# Altium PCB MainBoardPCB_PWR.PcbDoc (part 24 of 29)
Units mm, origin at the board's own origin, x right, y up, seen from the top; angles counter-clockwise.
Board outline 333.63 x 349.38 mm, 16 copper layers (L1, L2 (GND), L3 (Sign), L4 (GND), L5 (Sign), L6 (PWR/GND), L7(PWR/GND), L8 (PWR/GND), L9 (PWR/GND), L10 (PWR/GND), L11 (PWR/GND), L12 (Sign), L13 (GND), L14 (Sign), L15 (GND), L16), stack 2.503 mm thick; 2187 components, 1615 nets, 7987 pads, 1695 vias.
Unrouted connection lines stored in the file: 4757.
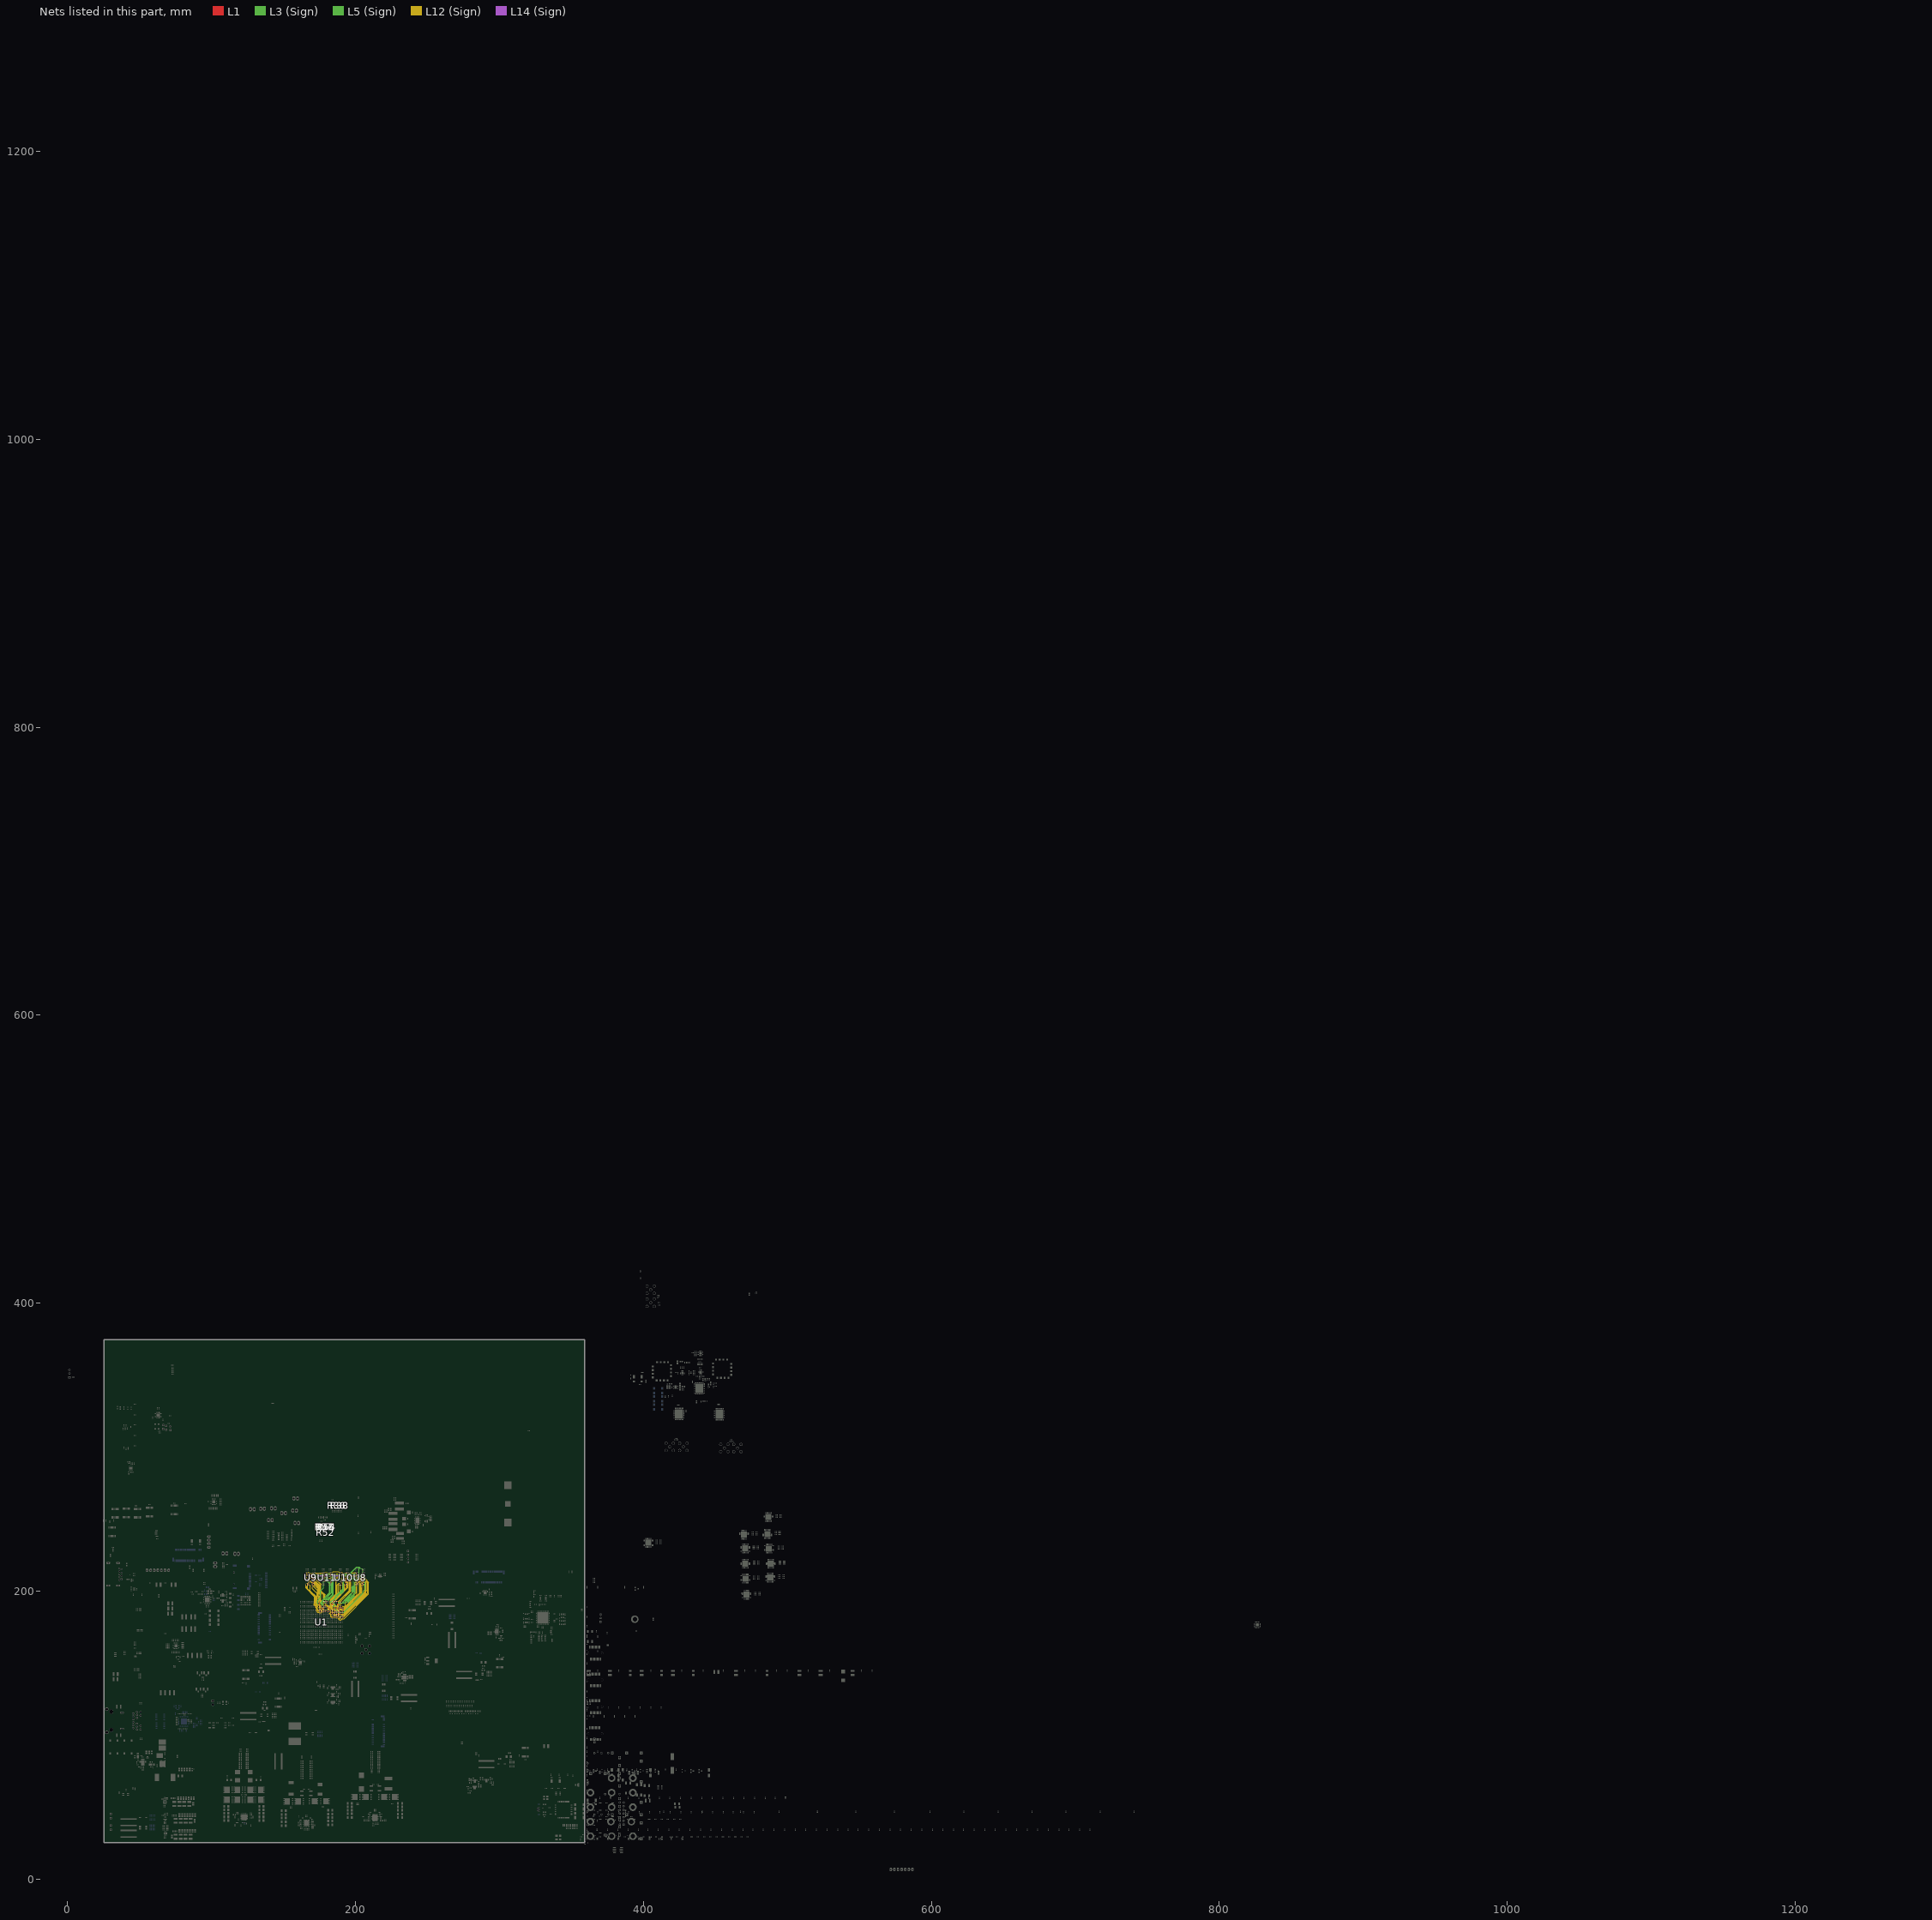
[diagram p19: the nets of this part, all layers, seen from the top]

## Via types
v1: diameter 0.5, hole 0.2, L1 to L16, 786 vias
v2: diameter 0.5/0.35/0.35/0.35/0.35/0.35/0.35/0.35/0.35/0.35/0.35/0.35/0.35/0.35/0.35/0.5 (per signal layer), hole 0.15, L1 to L16, tented both sides, 164 vias
v3: diameter 2.54, hole 1.02, L1 to L16, 152 vias
v4: diameter 0.5/0.35/0.35/0.35/0.35/0.35/0.35/0.35/0.35/0.35/0.35/0.35/0.35/0.35/0.35/0.5 (per signal layer), hole 0.2, L1 to L16, tented both sides, 100 vias
v5: diameter 0.45, hole 0.15, L1 to L16, 79 vias
v6: diameter 0.35/0/0.35 (per signal layer), hole 0.127, L1 to L3 (Sign), tented both sides, 78 vias
v7: diameter 0.45/0.45/0.45/0.45/0.45/0.45/0.45/0.45/0.45/0.45/0.45/0.45/0.45/0.45/0.45/0.45 (per signal layer), hole 0.15, L1 to L16, 65 vias
v8: diameter 0.4, hole 0.15, L1 to L16, 61 vias
v9: diameter 0.2, hole 0.1, L1 to L16, 35 vias
v10: diameter 0.5, hole 0.2, L1 to L16, tented both sides, 32 vias
v11: diameter 0.2/0/0.2 (per signal layer), hole 0.1, L1 to L3 (Sign), 28 vias
v12: diameter 0.4, hole 0.2, L1 to L16, 16 vias
v13: diameter 0.25, hole 0.2, L1 to L16, 16 vias
v14: diameter 0.3, hole 0.2, L1 to L16, 15 vias
v15: diameter 0.5/0.35/0.35/0.35/0.35/0.35/0.35/0.35/0.35/0.35/0.35/0.35/0.35/0.35/0.35/0.45 (per signal layer), hole 0.15, L1 to L16, tented both sides, 10 vias
v16: diameter 5, hole 3, L1 to L16, 9 vias
v17: diameter 0.2/0/0.2 (per signal layer), hole 0.1, L1 to L3 (Sign), tented both sides, 9 vias
v18: diameter 0.35/0/0.35 (per signal layer), hole 0.127, L1 to L3 (Sign), 7 vias
v19: diameter 0.35/0/0.35 (per signal layer), hole 0.127, L14 (Sign) to L16, tented both sides, 5 vias
v20: diameter 1.65, hole 1.65, L1 to L16, 4 vias
v21: diameter 1.15, hole 1.15, L1 to L16, 4 vias
v22: diameter 0.35, hole 0.127, L1 to L2 (GND), 2 vias
v23: diameter 0.4, hole 0.2, L1 to L16, tented both sides, 2 vias
v24: diameter 0.35, hole 0.127, L1 to L2 (GND), tented both sides, 2 vias
v25: diameter 0.508, hole 0.127, L1 to L2 (GND), 2 vias
v26: diameter 0.508, hole 0.127, L2 (GND) to L3 (Sign), 2 vias
v27: diameter 0.35, hole 0.127, L3 (Sign) to L6 (PWR/GND), tented both sides, 2 vias
v28: diameter 0.5, hole 0.2, L3 (Sign) to L6 (PWR/GND), tented both sides, 2 vias
v29: diameter 5.5, hole 3.5, L1 to L16, 1 vias
v30: diameter 0.45/0.45/0.45 (per signal layer), hole 0.15, L1 to L3 (Sign), 1 vias
v31: diameter 0.35/0.35/0.35 (per signal layer), hole 0.127, L1 to L3 (Sign), tented both sides, 1 vias
v32: diameter 0.45/0/0.45 (per signal layer), hole 0.15, L1 to L3 (Sign), tented both sides, 1 vias
v33: diameter 0.45/0/0.45 (per signal layer), hole 0.2, L14 (Sign) to L16, tented both sides, 1 vias
v34: diameter 0.35, hole 0.127, L2 (GND) to L3 (Sign), 1 vias

## Nets (pads, with @x,y where several pads share a name; then routed paths per layer and width w, separated by ;. In a path a pad name is that pad's centre, name@x,y a point inside that pad or via, vN(x,y) a via of type N, cw(c..) or ccw(c..) an arc to the next point about the centre after c; other vN are vias at no path point) (continued)
DDR4_BG0: R36.1 U1.AC28 U8.M2 U9.M2 U10.M2 U11.M2 | length 91.3
  L1 w0.116: U9.M2@171.206,212.248 v2(171.609,212.652) ; U11.M2@182.666,212.248 v2(183.07,212.652) ; v6(183.44,191.414) U1.AC28@183.927,190.927 ; U10.M2@194.127,212.248 v2(194.53,212.652) ; v15(205.215,212.621) U8.M2@205.618,212.217
  L5 (Sign) w0.092: v2(171.609,212.652) 172.737,211.524 178.132,211.524 178.398,211.523 180.823,211.524 181.453,212.153 182.572,212.153 v2(183.07,212.652) 184.198,211.524 192.283,211.524 192.913,212.153 194.032,212.153 v2(194.53,212.652) 195.321,211.861 195.455,211.861 ccw(c195.455,211.951) 195.544,211.951 195.544,212.114 cw(c195.634,212.114) 195.634,212.204 195.903,212.204 cw(c195.903,212.114) 195.992,212.114 195.992,211.861 195.992,211.608 ccw(c196.082,211.608) 196.082,211.519 196.351,211.519 ccw(c196.351,211.608) 196.44,211.608 196.44,211.861 196.44,212.037 cw(c196.53,212.037) 196.53,212.127 196.798,212.127 cw(c196.798,212.037) 196.888,212.037 196.888,211.861 196.888,211.608 ccw(c196.977,211.608) 196.977,211.519 197.246,211.519 ccw(c197.246,211.608) 197.336,211.608 197.336,211.861 197.336,212.037 cw(c197.425,212.037) 197.425,212.127 197.694,212.127 cw(c197.694,212.037) 197.783,212.037 197.783,211.861 197.783,211.608 ccw(c197.873,211.608) 197.873,211.519 198.142,211.519 ccw(c198.142,211.608) 198.231,211.608 198.231,211.861 198.231,212.037 cw(c198.321,212.037) 198.321,212.127 198.59,212.127 cw(c198.59,212.037) 198.679,212.037 198.679,211.861 198.679,211.608 ccw(c198.769,211.608) 198.769,211.519 199.037,211.519 ccw(c199.037,211.608) 199.127,211.608 199.127,211.861 199.127,212.114 cw(c199.216,212.114) 199.216,212.204 199.485,212.204 cw(c199.485,212.114) 199.575,212.114 199.575,211.951 ccw(c199.664,211.951) 199.664,211.861 200.482,211.861 200.495,211.861 200.908,211.448 201.575,211.448 202.15,211.449 202.691,211.989 204.179,211.989 204.81,212.621 v15(205.215,212.621)
  L3 (Sign) w0.092: v6(183.44,191.414) 183.44,191.689 182.917,192.211 182.901,192.227 182.901,192.652 183.202,192.953 183.384,192.953 183.614,193.183 183.857,193.183 185.222,194.548 185.222,194.625 186.168,195.571 186.168,196.559 186.553,196.945 186.693,197.085 186.904,197.296 cw(c186.974,197.225) 187.044,197.296 187.376,196.964 ccw(c187.446,197.034) 187.517,196.964 187.657,197.104 ccw(c187.587,197.174) 187.657,197.245 187.325,197.576 cw(c187.395,197.647) 187.325,197.717 187.465,197.857 cw(c187.536,197.787) 187.606,197.857 187.938,197.525 ccw(c188.008,197.595) 188.078,197.525 188.218,197.666 ccw(c188.148,197.736) 188.218,197.806 187.886,198.138 cw(c187.957,198.208) 187.886,198.278 188.027,198.418 cw(c188.097,198.348) 188.167,198.418 188.499,198.087 ccw(c188.569,198.157) 188.639,198.087 188.78,198.227 ccw(c188.71,198.297) 188.78,198.367 188.448,198.699 cw(c188.518,198.769) 188.448,198.84 188.588,198.98 cw(c188.658,198.91) 188.729,198.98 189.06,198.648 ccw(c189.131,198.718) 189.201,198.648 189.341,198.788 ccw(c189.271,198.859) 189.341,198.929 189.009,199.261 cw(c189.08,199.331) 189.009,199.401 189.22,199.612 189.57,199.962 191.659,202.05 191.659,209.131 192.168,209.64 192.168,209.871 192.392,210.095 192.392,211.28 192.796,211.684 195.732,211.684 200.736,216.687 202.603,216.687 203.263,216.027 203.754,216.027 204.251,215.531 204.433,215.531 205.11,214.853 205.11,212.966 205.151,212.925 205.151,212.684 v15(205.215,212.621)
DDR4_BG1: U1.AC27
DDR4_CAS: R57.1 U1.AJ29 U8.M5 U9.M5 U10.M5 U11.M5 | length 88.9
  L1 w0.116: U9.M5@166.406,212.248 166.802,212.645 v2(166.805,212.645) ; U11.M5@177.866,212.248 178.263,212.645 v2(178.265,212.645) ; U10.M5@189.327,212.248 189.723,212.645 v2(189.726,212.645) ; U1.AJ29@189.927,191.927 v6(190.414,192.414) ; U8.M5@200.787,212.248 200.79,212.248 v2(201.186,212.645)
  L12 (Sign) w0.092: 165.846,213.048 166.25,212.645 v2(166.805,212.645) 167.016,212.645 167.337,212.965 167.738,212.965 168.408,212.295 172.191,212.295 172.541,212.645 v2(178.265,212.645) 178.441,212.645 178.778,212.981 180.241,212.981 180.954,212.268 183.325,212.268 184.594,213.538 188.278,213.538 189.171,212.645 v2(189.726,212.645) 189.937,212.645 190.258,212.965 190.659,212.965 191.329,212.295 193.357,212.295 193.815,212.295 ccw(c193.815,212.384) 193.905,212.384 193.905,212.391 cw(c193.995,212.391) 193.995,212.48 194.263,212.48 cw(c194.263,212.391) 194.353,212.391 194.353,212.384 ccw(c194.442,212.384) 194.442,212.295 194.577,212.295 196.583,212.295 197.509,212.295 ccw(c197.509,212.384) 197.598,212.384 197.598,212.469 cw(c197.688,212.469) 197.688,212.558 197.957,212.558 cw(c197.957,212.469) 198.046,212.469 198.046,212.295 198.046,212.265 ccw(c198.136,212.265) 198.136,212.175 198.404,212.175 ccw(c198.404,212.265) 198.494,212.265 198.494,212.295 198.494,212.469 cw(c198.584,212.469) 198.584,212.558 198.852,212.558 cw(c198.852,212.469) 198.942,212.469 198.942,212.295 198.942,212.265 ccw(c199.031,212.265) 199.031,212.175 199.3,212.175 ccw(c199.3,212.265) 199.39,212.265 199.39,212.295 199.39,212.469 cw(c199.479,212.469) 199.479,212.558 199.748,212.558 cw(c199.748,212.469) 199.837,212.469 199.837,212.295 199.837,212.265 ccw(c199.927,212.265) 199.927,212.175 200.196,212.175 ccw(c200.196,212.265) 200.285,212.265 cw(c200.315,212.265) 200.315,212.295 200.509,212.295 200.859,212.645 v2(201.186,212.645)
  L3 (Sign) w0.092: v6(190.414,192.414) 191.268,192.414 191.331,192.477 198.417,199.563 198.514,199.661 198.514,199.76 ccw(c198.414,199.76) 198.414,199.859 197.577,199.859 cw(c197.577,199.958) 197.478,199.958 197.478,200.157 cw(c197.577,200.157) 197.577,200.256 198.514,200.256 199.305,200.256 ccw(c199.305,200.355) 199.404,200.355 199.404,200.554 ccw(c199.305,200.554) 199.305,200.653 198.514,200.653 197.577,200.653 cw(c197.577,200.752) 197.478,200.752 197.478,200.951 cw(c197.577,200.951) 197.577,201.05 198.514,201.05 199.567,201.05 ccw(c199.567,201.149) 199.666,201.149 199.666,201.348 ccw(c199.567,201.348) 199.567,201.447 198.514,201.447 197.577,201.447 cw(c197.577,201.546) 197.478,201.546 197.478,201.745 cw(c197.577,201.745) 197.577,201.844 198.514,201.844 199.567,201.844 ccw(c199.567,201.943) 199.666,201.943 199.666,202.142 ccw(c199.567,202.142) 199.567,202.241 198.514,202.241 197.577,202.241 cw(c197.577,202.34) 197.478,202.34 197.478,202.539 cw(c197.577,202.539) 197.577,202.638 198.514,202.638 199.567,202.638 ccw(c199.567,202.737) 199.666,202.737 199.666,202.936 ccw(c199.567,202.936) 199.567,203.035 198.514,203.035 197.577,203.035 cw(c197.577,203.134) 197.478,203.134 197.478,203.333 cw(c197.577,203.333) 197.577,203.432 198.514,203.432 199.54,203.432 ccw(c199.54,203.531) 199.639,203.531 199.639,203.73 ccw(c199.54,203.73) 199.54,203.829 198.545,203.829 cw(c198.545,203.86) 198.514,203.86 198.514,210.696 200.462,212.645 v2(201.186,212.645)
DDR4_CK0: U1.AE30
DDR4_CK1: U1.AF28
DDR4_CK_N: R52.1 U1.AF30 U8.K5 U9.K5 U10.K5 U11.K5 | length 88
  L1 w0.1: U1.AF30@186.927,192.927 187.4,192.454 v23(187.4,192.341) ; U8.K5@200.787,210.648 v2@201.184,210.251
  L1 w0.116: U9.K5@166.406,210.648 v2(166.809,210.244) ; U11.K5@177.866,210.648 v2(178.27,210.244) ; U10.K5@189.327,210.648 v2(189.73,210.244) ; v2(201.184,210.249) v2@201.184,210.251
  L5 (Sign) w0.1: v23@187.4,192.254 ccw(c187.619,192.254) 187.619,192.035 191.927,192.035 191.935,192.026 ; 198.704,198.196 199.002,198.494 ccw(c197.206,200.29) 199.746,200.29 199.746,206.887 cw(c202.498,206.887) 200.552,208.833 201.383,209.664 ccw(c201.2,209.848) 201.459,209.848 ccw(c201.156,209.848) 201.37,210.062 v2(201.184,210.249)
  L5 (Sign) w0.12: 191.935,192.026 192.303,192.026 ccw(c192.303,192.584) 192.697,192.189 193.106,192.598 ccw(c192.975,192.729) 193.16,192.729 ccw(c192.975,192.729) 193.106,192.86 192.587,193.379 cw(c192.882,193.674) 192.587,193.969 192.77,194.151 cw(c193.064,193.857) 193.359,194.151 194.823,192.687 ccw(c194.954,192.818) 195.085,192.687 195.268,192.87 ccw(c195.137,193.001) 195.322,193.001 ccw(c195.137,193.001) 195.268,193.132 193.804,194.596 cw(c194.098,194.891) 193.804,195.185 193.986,195.368 cw(c194.281,195.073) 194.576,195.368 196.04,193.904 ccw(c196.171,194.035) 196.302,193.904 196.484,194.086 ccw(c196.353,194.217) 196.538,194.217 ccw(c196.353,194.217) 196.484,194.348 195.02,195.812 cw(c195.315,196.107) 195.02,196.402 195.203,196.584 cw(c195.497,196.289) 195.792,196.584 197.256,195.12 ccw(c197.387,195.251) 197.518,195.12 197.701,195.303 ccw(c197.57,195.434) 197.755,195.434 ccw(c197.57,195.434) 197.701,195.565 196.237,197.029 cw(c196.531,197.324) 196.237,197.618 196.419,197.801 cw(c196.714,197.506) 197.009,197.801 198.473,196.337 ccw(c198.604,196.468) 198.735,196.337 198.917,196.519 ; 198.704,198.196 198.398,197.89 ccw(c198.693,197.595) 198.398,197.3 198.917,196.781 cw(c198.786,196.65) 198.971,196.65 cw(c198.786,196.65) 198.917,196.519
  L12 (Sign) w0.1: v2(166.809,210.244) v2@166.864,210.244
  L14 (Sign) w0.1: v2(166.809,210.244) 166.809,210.307 cw(c167.03,210.307) 167.03,210.528 167.55,210.528 ccw(c167.55,211.55) 168.273,210.827 168.449,211.003 cw(c170.245,209.207) 170.245,211.747 172.75,211.747 cw(c172.75,210.062) 173.941,211.254 ccw(c175.704,213.016) 175.704,210.524 177.991,210.524 cw(c177.991,210.244) v2(178.27,210.244) 178.27,210.355 cw(c178.448,210.355) 178.448,210.533 178.805,210.533 ccw(c178.805,212.074) 179.895,210.984 180.119,211.209 cw(c181.051,210.276) 181.051,211.595 183.26,211.595 cw(c183.26,209.055) 185.056,210.851 185.112,210.795 ccw(c185.766,211.449) 185.766,210.524 189.451,210.524 cw(c189.451,210.244) v2(189.73,210.244) 189.73,210.355 cw(c189.903,210.355) 189.903,210.528 190.969,210.528 ccw(c190.969,211.848) 191.903,210.914 192.557,211.569 cw(c193.108,211.018) 193.108,211.798 195.007,211.798 cw(c195.007,210.195) 196.141,211.328 196.143,211.326 ccw(c197.272,212.455) 197.272,210.858 199.049,210.858 199.302,210.858 199.632,210.858 cw(c199.632,210.681) 199.809,210.681 199.809,210.625 ccw(c199.986,210.625) 199.986,210.448 200.138,210.448 ccw(c200.138,210.625) 200.316,210.625 200.316,210.681 cw(c200.493,210.681) 200.493,210.858 200.822,210.858 201.329,210.858 201.345,210.858 cw(c201.345,210.744) 201.459,210.744 201.459,210.525 cw(c201.184,210.525) v2(201.184,210.249)
DDR4_CK_P: R54.1 U1.AG28 U8.K4 U9.K4 U10.K4 U11.K4 | length 88.2
  L1 w0.1: v23(187.427,191.567) 187.427,191.427 U1.AG28@187.927,190.927 ; U8.K4@201.587,210.648 v2@201.984,210.251
  L1 w0.116: v2(166.802,211.052) U9.K4@167.206,210.648 ; v2(178.263,211.052) U11.K4@178.666,210.648 ; v2(189.723,211.052) U10.K4@190.127,210.648 ; v2(201.984,210.249) v2@201.984,210.251
  L5 (Sign) w0.1: v23@187.447,191.587 v23(187.427,191.567) cw(c187.646,191.567) 187.646,191.786 191.927,191.786 191.935,191.794 ; 198.856,198.019 199.152,198.315 ccw(c197.206,200.261) 199.958,200.261 199.958,206.835 cw(c202.498,206.835) 200.702,208.631 201.56,209.49 ccw(c201.204,209.846) 201.708,209.846 201.708,209.848 cw(c202.011,209.848) 201.797,210.062 v2(201.984,210.249)
  L5 (Sign) w0.12: 191.935,191.794 192.304,191.794 ccw(c192.304,192.581) 192.861,192.025 193.27,192.434 ccw(c192.975,192.729) 193.392,192.729 ccw(c192.975,192.729) 193.27,193.024 192.751,193.543 cw(c192.882,193.674) 192.751,193.805 192.934,193.987 cw(c193.064,193.857) 193.195,193.987 194.659,192.523 ccw(c194.954,192.818) 195.249,192.523 195.432,192.706 ccw(c195.137,193.001) 195.554,193.001 ccw(c195.137,193.001) 195.432,193.296 193.968,194.76 cw(c194.098,194.891) 193.968,195.021 194.15,195.204 cw(c194.281,195.073) 194.412,195.204 195.876,193.74 ccw(c196.171,194.035) 196.466,193.74 196.648,193.922 ccw(c196.353,194.217) 196.77,194.217 ccw(c196.353,194.217) 196.648,194.512 195.184,195.976 cw(c195.315,196.107) 195.184,196.238 195.367,196.42 cw(c195.497,196.289) 195.628,196.42 197.092,194.956 ccw(c197.387,195.251) 197.682,194.956 197.865,195.139 ccw(c197.57,195.434) 197.987,195.434 ccw(c197.57,195.434) 197.865,195.729 196.401,197.193 cw(c196.531,197.324) 196.401,197.454 196.583,197.637 cw(c196.714,197.506) 196.845,197.637 198.309,196.173 ccw(c198.604,196.468) 198.899,196.173 199.081,196.355 ccw(c198.786,196.65) 199.203,196.65 ccw(c198.786,196.65) 199.081,196.945 198.562,197.464 cw(c198.693,197.595) 198.562,197.726 198.856,198.019
  L14 (Sign) w0.1: v2(166.802,211.052) 166.802,211.005 ccw(c167.03,211.005) 167.03,210.777 167.548,210.777 ccw(c167.548,211.556) 168.099,211.005 168.275,211.181 cw(c170.242,209.214) 170.242,211.996 172.75,211.996 cw(c172.75,210.062) 174.117,211.43 ccw(c175.704,213.016) 175.704,210.772 177.984,210.772 ccw(c177.984,211.052) v2(178.263,211.052) 178.263,210.967 ccw(c178.448,210.967) 178.448,210.782 178.804,210.782 ccw(c178.804,212.076) 179.72,211.161 179.944,211.386 cw(c181.05,210.28) 181.05,211.844 183.262,211.844 cw(c183.262,209.06) 185.23,211.028 185.286,210.972 ccw(c185.769,211.455) 185.769,210.772 189.444,210.772 ccw(c189.444,211.052) v2(189.723,211.052) 189.723,210.957 ccw(c189.903,210.957) 189.903,210.777 190.967,210.777 ccw(c190.967,211.854) 191.728,211.092 192.382,211.746 cw(c193.108,211.02) 193.108,212.046 195.009,212.046 cw(c195.009,210.2) 196.315,211.505 196.317,211.504 ccw(c197.275,212.463) 197.275,211.107 201.345,211.107 cw(c201.345,210.744) 201.708,210.744 201.708,210.525 ccw(c201.984,210.525) v2(201.984,210.249)
DDR4_CKE0: R38.1 U1.AC30 U8.K2 U9.K2 U10.K2 U11.K2 | length 92.8
  L1 w0.116: U9.K2@171.206,210.648 v2(171.609,210.244) ; U11.K2@182.666,210.648 v2(183.07,210.244) ; U1.AC30@183.927,192.927 v6(184.414,192.44) ; U10.K2@194.127,210.648 v2(194.53,210.244) ; U8.K2@205.587,210.648 v15(205.991,210.244)
  L5 (Sign) w0.092: v2(171.609,210.244) 172.185,210.82 172.355,210.82 174.401,208.774 179.645,208.774 179.683,208.812 179.961,208.812 181.017,209.867 182.178,209.867 182.555,210.244 v2(183.07,210.244) 183.799,210.244 185.81,208.233 190.761,208.233 191.403,208.875 191.426,208.875 192.034,209.484 192.359,209.484 192.743,209.867 193.505,209.867 193.882,210.244 v2(194.53,210.244) 194.53,210.012 196.084,208.458 196.977,208.458 197.527,208.458 ccw(c197.527,208.547) 197.616,208.547 197.616,208.726 cw(c197.706,208.726) 197.706,208.816 197.974,208.816 cw(c197.974,208.726) 198.064,208.726 198.064,208.458 198.064,208.189 ccw(c198.154,208.189) 198.154,208.1 198.422,208.1 ccw(c198.422,208.189) 198.512,208.189 198.512,208.458 198.512,208.726 cw(c198.601,208.726) 198.601,208.816 198.87,208.816 cw(c198.87,208.726) 198.96,208.726 198.96,208.458 198.96,208.189 ccw(c199.049,208.189) 199.049,208.1 199.318,208.1 ccw(c199.318,208.189) 199.407,208.189 199.407,208.368 cw(c199.497,208.368) 199.497,208.458 199.631,208.458 199.946,208.773 199.946,209.546 201.038,210.638 202.906,210.638 203.676,209.867 205.614,209.867 v15(205.991,210.244)
  L3 (Sign) w0.092: v6(184.414,192.44) 184.414,191.919 185.761,190.573 185.761,190.307 185.387,189.933 185.208,189.933 185.034,189.759 185.034,188.295 185.352,187.977 185.698,187.977 188.289,185.387 191.942,185.387 191.98,185.425 191.988,185.425 205.327,198.764 205.327,199.974 206.58,201.227 206.58,203.403 206.58,203.502 ccw(c206.48,203.502) 206.48,203.602 206.409,203.602 cw(c206.409,203.701) 206.31,203.701 206.31,203.899 cw(c206.409,203.899) 206.409,203.999 206.48,203.999 ccw(c206.48,204.098) 206.58,204.098 206.58,204.296 ccw(c206.48,204.296) 206.48,204.396 205.88,204.396 cw(c205.88,204.495) 205.781,204.495 205.781,204.693 cw(c205.88,204.693) 205.88,204.793 206.48,204.793 ccw(c206.48,204.892) 206.58,204.892 206.58,205.067 206.58,205.265 206.58,205.563 ccw(c206.48,205.563) 206.48,205.662 206.404,205.662 cw(c206.404,205.762) 206.305,205.762 206.305,205.96 cw(c206.404,205.96) 206.404,206.059 206.48,206.059 ccw(c206.48,206.159) 206.58,206.159 206.58,206.357 ccw(c206.48,206.357) 206.48,206.456 206.415,206.456 cw(c206.415,206.556) 206.316,206.556 206.316,206.754 cw(c206.415,206.754) 206.415,206.853 206.48,206.853 ccw(c206.48,206.953) 206.58,206.953 206.58,207.061 206.58,209.655 v15(205.991,210.244)
DDR4_CKE1: U1.AB28
DDR4_CS_B: R46.1 U1.AD30 U8.L4 U9.L4 U10.L4 U11.L4 | length 89.5
  L1 w0.116: U9.L4@167.206,211.448 167.602,211.844 v2(167.605,211.844) ; U11.L4@178.666,211.448 179.063,211.845 v2(179.065,211.845) ; U1.AD30@184.927,192.927 v6(185.414,193.414) ; U10.L4@190.127,211.448 190.523,211.844 v2(190.526,211.844) ; U8.L4@201.587,211.448 201.984,211.845 v1(201.986,211.845)
  L12 (Sign) w0.092: 165.92,211.844 166.258,211.506 167.266,211.506 v2(167.605,211.844) 167.766,211.684 177.714,211.684 177.949,211.448 178.669,211.448 v2(179.065,211.845) 179.29,211.62 185.09,211.62 185.635,212.165 188.52,212.165 189.179,211.506 190.187,211.506 v2(190.526,211.844) 190.991,211.379 191.791,210.579 193.129,210.579 193.434,210.883 194.005,210.883 194.221,210.668 197.333,210.668 199.152,210.668 cw(c199.152,210.578) 199.242,210.578 199.242,210.267 ccw(c199.331,210.267) 199.331,210.178 199.6,210.178 ccw(c199.6,210.267) 199.69,210.267 199.69,210.578 cw(c199.779,210.578) 199.779,210.668 200.048,210.668 cw(c200.048,210.578) 200.137,210.578 200.137,210.428 ccw(c200.227,210.428) 200.227,210.338 200.496,210.338 ccw(c200.496,210.428) 200.585,210.428 200.585,210.578 cw(c200.675,210.578) 200.675,210.668 200.809,210.668 201.52,211.379 v1(201.986,211.845)
  L3 (Sign) w0.092: v6(185.414,193.414) 185.414,194.546 189.573,198.704 cw(c189.622,198.655) 189.67,198.704 190.154,198.221 ccw(c190.224,198.291) 190.294,198.221 190.435,198.361 ccw(c190.364,198.431) 190.435,198.501 189.902,199.034 189.547,199.389 cw(c189.617,199.459) 189.547,199.53 189.687,199.67 cw(c189.757,199.6) 189.827,199.67 190.183,199.314 190.715,198.782 ccw(c190.785,198.852) 190.856,198.782 190.996,198.923 ccw(c190.926,198.993) 190.996,199.063 190.464,199.595 190.108,199.951 cw(c190.178,200.021) 190.108,200.091 190.249,200.231 cw(c190.319,200.161) 190.389,200.231 190.745,199.876 191.277,199.344 ccw(c191.347,199.414) 191.417,199.344 191.557,199.484 ccw(c191.487,199.554) 191.557,199.624 191.025,200.157 190.67,200.512 cw(c190.74,200.582) 190.67,200.653 190.81,200.793 cw(c190.88,200.723) 190.95,200.793 191.306,200.437 191.633,200.11 ccw(c191.703,200.18) 191.774,200.11 191.914,200.25 ccw(c191.844,200.321) 191.914,200.391 191.657,200.648 cw(c191.727,200.718) 191.657,200.788 191.727,200.858 191.851,200.982 191.851,209.051 192.36,209.561 192.36,209.678 192.602,209.92 192.602,211.177 192.614,211.189 192.614,211.2 192.777,211.364 192.788,211.364 192.79,211.365 192.793,211.365 192.895,211.468 195.788,211.468 200.793,216.473 201.84,216.473 202.587,215.725 202.587,213.593 202.348,213.353 202.348,213.287 202.233,213.173 202.233,212.851 202.307,212.777 202.307,212.512 202.233,212.438 202.233,212.092 v1(201.986,211.845)
DDR4_CS_N1: U1.AD29
DDR4_DM0: U1.AJ20 U8.E2 | length 33.5
  L1 w0.116: U1.AJ20@189.927,182.927 v2(190.331,182.523) ; U8.E2@205.587,206.648 v2(205.991,207.052)
  L12 (Sign) w0.092: v2(190.331,182.523) 190.598,182.791 190.598,182.87 190.847,183.119 191.225,183.119 191.602,183.119 207.058,198.574 207.058,204.979 207.08,205 207.08,205.903 205.991,206.992 v2(205.991,207.052)
DDR4_DM1: U1.AJ25 U8.E4 | length 27
  L1 w0.116: U1.AJ25@189.927,187.927 v4(190.414,188.414) ; U8.E4@201.587,206.648 v2(201.991,207.052)
  L12 (Sign) w0.092: v4(190.414,188.414) 190.916,188.414 191.231,188.1 191.275,188.1 191.281,188.093 191.547,188.093 191.554,188.1 192.138,188.1 202.827,198.789 202.827,206.397 202.173,207.052 v2(201.991,207.052)
DDR4_DM2: U1.AF21 U10.E2 | length 31.2
  L1 w0.116: v4(186.44,184.414) U1.AF21@186.927,183.927 ; U10.E2@194.127,206.648 v2(194.53,207.052)
  L12 (Sign) w0.092: v4(186.44,184.414) 186.791,184.063 187.49,184.063 187.546,184.119 187.547,184.119 187.735,184.307 187.735,184.308 188.337,184.909 188.337,185.811 187.337,186.811 187.337,188.876 185.344,190.868 185.344,192.82 194.92,202.396 194.92,206.662 v2(194.53,207.052)
DDR4_DM3: U1.AE25 U10.E4 | length 24.3
  L1 w0.116: v4(185.44,188.414) U1.AE25@185.927,187.927 ; U10.E4@190.127,206.648 v2(190.53,206.244)
  L12 (Sign) w0.092: v4(185.44,188.414) 185.028,188.002 184.292,188.002 184.044,188.25 184.044,190.268 184,190.312 184,190.494 183.989,190.505 183.989,192.593 184,192.604 184,193.418 191.275,200.693 191.275,200.96 191.302,200.987 191.302,205.473 v2(190.53,206.244)
DDR4_DM4: U1.Y24 U9.E2 | length 26.2
  L1 w0.116: v2(170.802,206.244) U9.E2@171.206,206.648 ; v10(180.44,186.44) U1.Y24@180.927,186.927
  L12 (Sign) w0.092: v2(170.802,206.244) 171.06,206.244 174.864,202.441 174.864,198.427 175.692,197.599 175.692,193.586 176.173,193.105 176.173,191.605 177.316,190.462 177.316,188.241 178.018,187.539 178.018,187.25 178.25,187.018 178.578,187.018 178.654,187.094 179.225,187.094 179.342,186.977 179.596,186.977 180.133,186.44 v10(180.44,186.44)
DDR4_DM5: U1.R24 U9.E4 | length 27.3
  L1 w0.116: U9.E4@167.206,206.648 v2(167.609,206.244) ; U1.R24@175.927,186.927 v10(176.414,187.414)
  L12 (Sign) w0.092: v2(167.609,206.244) 166.648,205.283 166.648,201.508 172.11,196.045 172.11,191.401 172.415,191.097 172.415,190.005 173.371,189.049 173.371,186.977 173.759,186.588 174.231,186.588 174.663,187.02 175.704,187.02 176.099,187.414 v10(176.414,187.414)
DDR4_DM6: U1.V28 U11.E2 | length 19.8
  L1 w0.116: v6(178.44,191.414) U1.V28@178.927,190.927 ; U11.E2@182.666,206.648 183.063,206.252 v6(183.063,206.249)
  L3 (Sign) w0.092: v6(178.44,191.414) 178.44,191.813 178.854,192.227 178.854,192.621 178.625,192.85 178.141,192.85 177.895,193.096 177.895,193.62 178.202,193.927 178.624,193.927 183.595,198.898 183.595,205.719 183.592,205.719 v6(183.063,206.249)
DDR4_DM7: U1.P28 U11.E4 | length 19.6
  L1 w0.116: v6(174.44,191.414) U1.P28@174.927,190.927 ; v6(178.27,207.047) 178.27,207.044 U11.E4@178.666,206.648
  L3 (Sign) w0.092: v6(174.44,191.414) 173.779,191.414 173.531,191.662 173.531,193.351 175.832,195.651 175.832,200.16 177.866,202.195 177.866,206.643 v6(178.27,207.047)
DDR4_DM8: U1.AA27
DDR4_DQ0: U1.AH22 U8.G2 | length 46.8
  L1 w0.116: U1.AH22@188.927,184.927 v4(189.414,184.44) ; U8.G2@205.587,208.248 v2(205.991,208.652)
  L12 (Sign) w0.092: v4(189.414,184.44) 188.659,183.684 188.659,183.406 187.844,182.591 187.844,182.586 187.795,182.537 187.795,181.059 188.603,180.251 189.068,180.251 189.276,180.044 189.604,180.044 189.724,180.164 190.336,180.164 191.059,180.886 191.999,180.886 209.08,197.968 209.08,206.25 206.678,208.652 v2(205.991,208.652)
DDR4_DQ1: U1.AH21 U8.F4 | length 39.2
  L1 w0.116: U1.AH21@188.927,183.927 v4(189.414,183.44) ; v2(201.184,207.852) U8.F4@201.587,207.448
  L12 (Sign) w0.092: v4(189.414,183.44) 190.099,184.125 190.275,184.125 190.281,184.119 190.547,184.119 190.553,184.125 191.275,184.125 191.281,184.119 191.547,184.119 191.598,184.169 191.637,184.169 206.591,199.123 206.591,205.055 206.696,205.16 206.696,205.744 205.901,206.539 205.718,206.539 205.226,207.031 205.144,207.031 204.645,207.531 204.251,207.531 204.063,207.719 203.584,207.719 202.337,208.965 201.858,208.965 201.184,208.291 v2(201.184,207.852)
DDR4_DQ2: U1.AJ22 U8.H3 | length 45.3
  L1 w0.116: U1.AJ22@189.927,184.927 v4(190.414,184.44) ; v2(204.384,209.452) U8.H3@204.787,209.048
  L12 (Sign) w0.092: v4(190.414,184.44) 189.926,184.44 189.421,183.934 189.192,183.934 188.85,183.593 188.85,183.326 188.036,182.512 188.036,181.216 188.326,180.927 188.852,180.927 190.068,182.143 190.503,182.143 191.01,182.65 191.01,182.656 191.198,182.844 191.464,182.844 191.501,182.881 191.868,182.881 207.25,198.263 207.25,204.899 207.272,204.921 207.272,205.982 206.362,206.892 206.362,207.135 206.081,207.415 205.303,207.415 204.897,207.822 204.897,208.593 204.384,209.106 v2(204.384,209.452)
DDR4_DQ3: U1.AK22 U8.H4 | length 34.5
  L1 w0.116: U1.AK22@190.927,184.927 v4(191.414,184.44) ; U8.H4@201.587,209.048 v2(201.991,208.644)
  L12 (Sign) w0.092: v4(191.414,184.44) 206.399,199.424 206.399,205.134 206.504,205.239 206.504,205.664 205.821,206.347 205.639,206.347 205.146,206.839 205.065,206.839 204.576,207.327 203.308,207.327 v2(201.991,208.644)
DDR4_DQ4: U1.AK20 U8.H2 | length 36.6
  L1 w0.116: U1.AK20@190.927,182.927 v2(191.331,182.523) ; v2(205.184,209.452) U8.H2@205.587,209.048
  L12 (Sign) w0.092: v2(191.331,182.523) 192.023,182.523 207.442,197.942 207.442,204.82 207.464,204.841 207.464,206.062 206.565,206.96 206.565,207.234 206.192,207.607 205.44,207.607 205.39,207.656 205.386,207.656 205.089,207.953 205.089,208.96 205.184,209.055 v2(205.184,209.452)
DDR4_DQ5: U1.AJ19 U8.H5 | length 44.5
  L1 w0.116: U1.AJ19@189.927,181.927 v2(190.331,181.523) ; v2(200.384,209.452) U8.H5@200.787,209.048
  L12 (Sign) w0.092: v2(190.331,181.523) 190.655,181.523 191.148,182.016 191.546,182.016 191.861,182.331 192.103,182.331 207.634,197.863 207.634,198.104 208.358,198.828 208.358,199.097 208.369,199.108 208.369,199.695 207.656,200.408 207.656,206.415 206.223,207.848 205.465,207.848 205.296,208.018 205.296,208.776 205.505,208.985 205.505,209.585 205.241,209.848 202.641,209.848 202.457,209.664 202.275,209.664 202.25,209.639 202.124,209.765 201.858,209.765 201.795,209.702 200.634,209.702 v2(200.384,209.452)
DDR4_DQ6: U1.AK19 U8.J3 | length 40.6
  L1 w0.116: U1.AK19@190.927,181.927 v2(191.331,181.523) ; v2(204.251,210.312) 204.323,210.312 204.387,210.248 U8.J3@204.787,209.848
  L12 (Sign) w0.092: v2(191.331,181.523) 191.531,181.724 191.721,181.913 191.934,181.913 192.16,182.139 192.182,182.139 207.826,197.783 207.826,197.805 208.561,198.541 208.561,205.795 206.318,208.039 206.304,208.039 206.302,208.04 205.795,208.04 205.587,208.248 205.587,208.796 205.697,208.906 205.697,209.664 205.614,209.747 205.614,210.337 205.393,210.557 204.689,210.557 204.38,210.248 204.317,210.312 v2(204.251,210.312)
DDR4_DQ7: U1.AH19 U8.J4 | length 41
  L1 w0.116: v4(188.44,181.44) U1.AH19@188.927,181.927 ; U8.J4@201.587,209.848 v2(201.991,209.444)
  L12 (Sign) w0.092: v4(188.44,181.44) 189.029,181.44 189.865,182.275 189.865,183.455 190.221,183.811 191.646,183.811 206.866,199.03 206.866,205.058 206.888,205.08 206.888,205.823 205.98,206.731 205.798,206.731 205.305,207.223 205.224,207.223 204.705,207.742 204.705,207.985 204.516,208.173 204.251,208.173 204.218,208.14 203.67,208.14 203.251,208.559 202.366,209.444 v2(201.991,209.444)
DDR4_DQ8: U1.AH23 U8.A3 | length 25.4
  L1 w0.116: U1.AH23@188.927,185.927 v4(189.414,186.414) ; v2(204.384,203.044) U8.A3@204.787,203.448
  L12 (Sign) w0.092: v4(189.414,186.414) 189.871,186.871 191.687,186.871 191.847,187.03 192.265,187.03 204.384,199.149 v2(204.384,203.044)
DDR4_DQ9: U1.AK23 U8.B5 | length 39.3
  L1 w0.116: U1.AK23@190.927,185.927 v4(191.414,186.414) ; v2(200.384,203.844) U8.B5@200.787,204.248
  L12 (Sign) w0.092: v4(191.414,186.414) 192.703,186.414 204.705,198.416 204.705,203.711 206.312,205.319 206.312,205.585 205.742,206.155 205.559,206.155 205.067,206.647 204.985,206.647 204.659,206.973 203.066,206.973 202.283,207.757 201.572,207.757 201.251,207.436 201.251,206.724 201.528,206.447 201.528,206.146 201.505,206.123 201.505,206.119 201.408,206.022 201.408,205.94 201.316,205.848 200.971,205.848 200.596,206.223 200.201,206.223 199.798,205.819 199.798,204.834 200.384,204.249 v2(200.384,203.844)
DDR4_DQ10: U1.AG24 U8.C3 | length 27.9
  L1 w0.116: U1.AG24@187.927,186.927 187.93,186.927 v4(188.43,187.427) ; v2(204.384,204.644) U8.C3@204.787,205.048
  L12 (Sign) w0.092: v4(188.43,187.427) 188.951,186.906 189.574,186.906 189.731,187.063 191.555,187.063 191.715,187.222 192.185,187.222 204.02,199.057 204.02,204.281 v2(204.384,204.644)
DDR4_DQ11: U1.AK24 U8.C4 | length 32.4
  L1 w0.116: U1.AK24@190.927,186.927 v4(191.414,187.414) ; U8.C4@201.587,205.048 v2(201.991,205.452)
  L12 (Sign) w0.092: v4(191.414,187.414) 192.106,187.414 203.721,199.03 203.721,204.521 204.935,205.735 204.935,206.154 204.5,206.589 202.907,206.589 202.124,207.373 201.783,207.373 201.635,207.224 201.635,206.937 201.841,206.731 202.171,206.731 202.548,206.354 202.548,206.009 v2(201.991,205.452)
DDR4_DQ12: U1.AJ26 U8.C2 | length 32.1
  L1 w0.116: U1.AJ26@189.927,188.927 v4(190.414,189.414) ; U8.C2@205.587,205.048 v2(205.991,205.452)
  L12 (Sign) w0.092: v4(190.414,189.414) 192.297,189.414 193.04,190.157 193.04,191.427 200.474,198.861 200.474,203.281 200.708,203.515 200.708,204.327 199.99,205.045 199.99,205.572 200.191,205.773 200.562,205.773 200.711,205.624 201.363,205.624 201.748,206.009 201.748,206.499 201.443,206.804 201.443,207.304 201.704,207.565 202.203,207.565 202.986,206.781 204.579,206.781 204.906,206.455 204.987,206.455 205.48,205.963 v2(205.991,205.452)
DDR4_DQ13: U1.AK25 U8.C5 | length 22.9
  L1 w0.116: U1.AK25@190.927,187.927 v4(191.414,188.414) ; v2(200.384,205.452) U8.C5@200.787,205.048
  L12 (Sign) w0.092: v4(191.414,188.414) 192.018,188.414 200.99,197.387 200.99,204.845 v2(200.384,205.452)
DDR4_DQ14: U1.AG25 U8.D3 | length 28.9
  L1 w0.116: U1.AG25@187.927,187.927 187.933,187.927 188.43,188.424 v4(188.43,188.455) ; v2(204.384,206.252) U8.D3@204.787,205.848
  L12 (Sign) w0.092: v4(188.43,188.455) 189.154,187.731 189.277,187.731 189.281,187.735 192.155,187.735 203.529,199.109 203.529,205.397 v2(204.384,206.252)
DDR4_DQ15: U1.AH26 U8.D4 | length 24
  L1 w0.116: U1.AH26@188.927,188.927 v4(189.414,189.414) ; v2(201.184,206.252) U8.D4@201.587,205.848
  L12 (Sign) w0.092: v4(189.414,189.414) 189.414,190.561 199.606,200.753 199.606,206.075 200.033,206.502 200.933,206.502 v2(201.184,206.252)
DDR4_DQ16: U1.AD22 U10.G2 | length 34.4
  L1 w0.116: v4(184.44,184.44) U1.AD22@184.927,184.927 ; U10.G2@194.127,208.248 v2(194.53,208.652)
  L12 (Sign) w0.092: v4(184.44,184.44) 185.085,183.794 187.493,183.794 187.625,183.927 187.627,183.927 187.927,184.227 187.927,184.229 188.529,184.83 188.529,185.891 187.529,186.891 187.529,190.641 187.901,191.014 187.901,192.843 195.567,200.508 195.567,208.204 195.12,208.652 v2(194.53,208.652)
DDR4_DQ17: U1.AE22 U10.F4 | length 33.9
  L1 w0.116: v4(185.44,184.44) U1.AE22@185.927,184.927 ; U10.F4@190.127,207.448 v2(190.53,207.044)
  L12 (Sign) w0.092: v4(185.44,184.44) 185.905,184.44 186.276,184.81 187.536,184.81 187.953,185.227 187.953,185.652 186.953,186.652 186.953,188.716 184.96,190.709 184.96,190.892 184.949,190.903 184.949,192.195 184.96,192.206 184.96,193.021 194.28,202.341 194.28,205.287 194.044,205.523 194.044,205.585 193.856,205.773 193.554,205.773 192.1,207.226 190.712,207.226 v2(190.53,207.044)
DDR4_DQ18: U1.AF22 U10.H3 | length 32
  L1 w0.116: U1.AF22@186.927,184.927 v4(187.414,184.44) ; U10.H3@193.327,209.048 v2(193.73,209.452)
  L12 (Sign) w0.092: v4(187.414,184.44) 187.437,184.44 188.145,185.148 188.145,185.732 187.145,186.732 187.145,188.796 185.152,190.789 185.152,190.971 185.141,190.983 185.141,192.115 185.152,192.127 185.152,192.941 194.526,202.315 194.526,205.549 193.73,206.345 v2(193.73,209.452)
DDR4_DQ19: U1.AG21 U10.H4 | length 38.2
  L1 w0.116: v4(187.44,183.44) U1.AG21@187.927,183.927 ; v2(189.723,208.644) U10.H4@190.127,209.048
  L12 (Sign) w0.092: v4(187.44,183.44) 187.569,183.569 187.569,183.598 187.705,183.735 187.706,183.735 188.119,184.148 188.119,184.149 188.721,184.75 188.721,185.97 187.721,186.97 187.721,190.561 188.316,191.156 188.316,192.985 196.101,200.77 196.101,208.09 195.143,209.048 194.342,209.048 194.101,209.289 194.101,209.594 193.892,209.803 193.607,209.803 193.327,209.523 193.327,209.227 192.744,208.644 v2(189.723,208.644)
DDR4_DQ20: U1.AD20 U10.H2 | length 36.7
  L1 w0.116: v10(184.44,182.44) U1.AD20@184.927,182.927 ; U10.H2@194.127,209.048 v2(194.53,209.452)
  L12 (Sign) w0.092: v10(184.44,182.44) 185.044,183.044 187.628,183.044 187.784,183.2 187.784,183.543 187.786,183.543 188.311,184.068 188.311,184.07 188.913,184.671 188.913,186.087 187.913,187.087 187.913,190.482 188.57,191.139 188.57,192.968 196.469,200.867 196.469,207.994 195.011,209.452 v2(194.53,209.452)
DDR4_DQ21: U1.AF20 U10.H5 | length 35.8
  L1 w0.116: v4(186.44,182.44) U1.AF20@186.927,182.927 ; v2(188.923,208.644) U10.H5@189.327,209.048
  L12 (Sign) w0.092: v4(186.44,182.44) 186.186,182.186 185.915,182.186 185.77,182.042 183.277,182.042 183.044,182.276 183.044,186.604 183.045,186.606 183.045,188.615 182.78,188.88 182.78,194.065 186.679,197.964 186.679,208.581 187.33,209.232 188.54,209.232 188.923,208.85 v2(188.923,208.644)
DDR4_DQ22: U1.AE20 U10.J3 | length 38.5
  L1 w0.116: v4(185.44,182.44) U1.AE20@185.927,182.927 ; v2(192.923,209.444) U10.J3@193.327,209.848
  L12 (Sign) w0.092: v4(185.44,182.44) 185.791,182.791 187.647,182.791 188.008,183.152 188.008,183.487 189.105,184.584 189.105,186.27 188.105,187.27 188.105,190.376 188.927,191.199 188.927,192.178 196.952,200.203 196.952,207.782 194.886,209.848 194.241,209.848 194.094,209.994 193.473,209.994 v2(192.923,209.444)
DDR4_DQ23: U1.AG20 U10.J4 | length 39
  L1 w0.116: v4(187.44,182.44) U1.AG20@187.927,182.927 ; v2(189.723,209.444) U10.J4@190.127,209.848
  L12 (Sign) w0.092: v4(187.44,182.44) 186.991,181.991 185.991,181.991 185.839,181.839 183.172,181.839 182.829,182.181 182.829,183.596 182.119,184.307 182.119,184.573 182.852,185.306 182.852,186.683 182.853,186.685 182.853,188.535 182.588,188.801 182.588,194.145 186.487,198.044 186.487,208.661 187.674,209.848 189.32,209.848 v2(189.723,209.444)
DDR4_DQ24: U1.AG23 U10.A3 | length 24
  L1 w0.116: v4(187.44,185.44) U1.AG23@187.927,185.927 ; v2(192.923,203.044) U10.A3@193.327,203.448
  L12 (Sign) w0.092: v4(187.44,185.44) 186.961,185.44 185.761,186.64 185.761,188.547 185.226,189.082 185.226,189.628 184.384,190.471 184.384,190.653 184.373,190.664 184.373,192.433 184.384,192.445 184.384,193.259 192.799,201.674 192.799,202.92 v2(192.923,203.044)
DDR4_DQ25: U1.AF23 U10.B5 | length 25.8
  L1 w0.116: v4(186.44,185.44) U1.AF23@186.927,185.927 ; v2(188.923,204.652) U10.B5@189.327,204.248
  L12 (Sign) w0.092: v4(186.44,185.44) 186.194,185.194 185.753,185.194 185.623,185.064 185.293,185.064 185.014,185.344 184.29,185.344 184.061,185.572 184.061,187.165 183.66,187.566 183.66,190.109 183.616,190.153 183.616,190.335 183.605,190.346 183.605,192.752 183.616,192.763 183.616,193.577 183.66,193.621 183.66,194.13 189.343,199.814 189.343,204.248 188.94,204.652 v2(188.923,204.652)
DDR4_DQ26: U1.AF25 U10.C3 | length 22.7
  L1 w0.116: v4(186.44,188.414) U1.AF25@186.927,187.927 ; v2(192.923,204.644) U10.C3@193.327,205.048
  L12 (Sign) w0.092: v4(186.44,188.414) 186.44,188.686 184.576,190.55 184.576,190.733 184.565,190.744 184.565,192.354 184.576,192.365 184.576,193.18 193.777,202.381 193.777,204.267 193.37,204.673 192.952,204.673 v2(192.923,204.644)
DDR4_DQ27: U1.AE23 U10.C4 | length 24.7
  L1 w0.116: v4(185.44,185.44) U1.AE23@185.927,185.927 ; U10.C4@190.127,205.048 v2(190.53,204.644)
  L12 (Sign) w0.092: v4(185.44,185.44) 185.44,186.556 184.861,187.134 184.861,187.553 184.604,187.81 184.196,187.81 183.852,188.155 183.852,190.188 183.808,190.232 183.808,190.415 183.797,190.426 183.797,192.672 183.808,192.683 183.808,193.498 183.852,193.542 183.852,193.808 191.11,201.066 191.11,204.065 v2(190.53,204.644)
DDR4_DQ28: U1.AC22 U10.C2 | length 31.5
  L1 w0.116: v4(183.44,184.44) U1.AC22@183.927,184.927 ; v2(193.723,205.452) U10.C2@194.127,205.048
  L12 (Sign) w0.092: v4(183.44,184.44) 184.141,185.141 184.713,185.141 184.982,184.872 185.872,184.872 186.002,185.002 187.456,185.002 187.761,185.307 187.761,185.573 186.761,186.573 186.761,188.637 184.768,190.63 184.768,190.812 184.757,190.824 184.757,192.274 184.768,192.286 184.768,193.1 193.992,202.325 193.992,205.184 193.725,205.452 v2(193.723,205.452)
DDR4_DQ29: U1.AC23 U10.C5 | length 24.7
  L1 w0.116: v4(183.44,185.44) U1.AC23@183.927,185.927 ; U10.C5@189.327,205.048 v2(189.73,204.644)
  L12 (Sign) w0.092: v4(183.44,185.44) 183.869,185.869 183.869,186.96 183.632,187.197 183.632,187.323 183.468,187.487 183.468,190.029 183.424,190.073 183.424,190.256 183.413,190.267 183.413,192.831 183.424,192.842 183.424,193.657 183.468,193.701 183.468,194.21 188.252,198.995 188.252,204.773 188.546,205.067 189.308,205.067 v2(189.73,204.644)
DDR4_DQ30: U1.AD25 U10.D3 | length 22
  L1 w0.116: v4(184.44,188.414) U1.AD25@184.927,187.927 ; v2(192.923,205.444) U10.D3@193.327,205.848
  L12 (Sign) w0.092: v4(184.44,188.414) 184.44,190.143 184.192,190.391 184.192,190.574 184.181,190.585 184.181,192.513 184.192,192.524 184.192,193.339 192.375,201.522 192.375,204.896 v2(192.923,205.444)
DDR4_DQ31: U1.AC24 U10.D4 | length 24
  L1 w0.116: v4(183.44,186.44) U1.AC24@183.927,186.927 ; v2(189.723,205.444) U10.D4@190.127,205.848
  L12 (Sign) w0.092: v4(183.44,186.44) 183.44,187.243 183.276,187.407 183.276,188.89 182.972,189.194 182.972,193.986 187.281,198.295 187.281,204.236 188.49,205.444 v2(189.723,205.444)
DDR4_DQ32: U1.U24 U9.G2 | length 24.8
  L1 w0.116: v2(170.802,207.844) U9.G2@171.206,208.248 ; U1.U24@177.927,186.927 v10(178.414,187.414)
  L12 (Sign) w0.092: v2(170.802,207.844) 170.802,207.162 175.056,202.909 175.056,198.718 175.884,197.89 175.884,193.699 176.365,193.218 176.365,191.685 177.508,190.542 177.508,188.321 v10(178.414,187.414)
DDR4_DQ33: U1.V23 U9.F4 | length 27.7
  L1 w0.116: U9.F4@167.206,207.448 v2(167.609,207.044) ; v10(178.44,186.414) U1.V23@178.927,185.927
  L12 (Sign) w0.092: v2(167.609,207.044) 168.223,207.044 169.413,205.854 170.167,205.854 170.562,205.459 171.256,205.459 174.48,202.236 174.48,198.199 175.308,197.371 175.308,193.335 175.741,192.902 175.741,191.66 175.781,191.621 175.781,191.454 176.932,190.303 176.932,188 177.194,187.738 177.194,187.66 177.634,187.22 177.634,187.091 178.091,186.634 178.111,186.634 178.331,186.414 v10(178.44,186.414)
DDR4_DQ34: U1.U25 U9.H3 | length 25.8
  L1 w0.116: v2(170.002,208.644) U9.H3@170.406,209.048 ; U1.U25@177.927,187.927 v10(178.414,188.414)
  L12 (Sign) w0.092: v2(170.002,208.644) 171.217,208.644 171.271,208.591 171.271,207.466 175.248,203.489 175.248,199.048 176.119,198.176 176.119,193.735 176.557,193.297 176.557,191.764 177.521,190.8 177.744,190.8 178.414,190.129 v10(178.414,188.414)
DDR4_DQ35: U1.V24 U9.H4 | length 29.6
  L1 w0.116: U9.H4@167.206,209.048 v2(167.609,208.644) ; U1.V24@178.927,186.927 v10(179.414,186.44)
  L12 (Sign) w0.092: v2(167.609,208.644) 167.609,208.107 169.671,206.046 170.247,206.046 170.642,205.651 171.336,205.651 174.672,202.315 174.672,198.279 175.5,197.451 175.5,193.415 175.933,192.981 175.933,191.74 175.981,191.692 175.981,191.526 177.124,190.383 177.124,190.277 177.124,188.201 177.124,188.103 177.826,187.4 177.826,187.171 178.171,186.826 179.028,186.826 v10(179.414,186.44)
DDR4_DQ36: U1.Y25 U9.H2 | length 25.1
  L1 w0.116: U9.H2@171.206,209.048 v2(171.609,208.644) ; v10(180.44,188.414) U1.Y25@180.927,187.927
  L12 (Sign) w0.092: v2(171.609,208.644) 171.609,207.399 175.44,203.568 175.44,199.941 177.824,197.557 177.824,191.03 v10(180.44,188.414)
DDR4_DQ37: U1.AA23 U9.H5 | length 36.2
  L1 w0.116: v2(166.002,208.644) U9.H5@166.406,209.048 ; U1.AA23@181.927,185.927 v10(182.414,186.414)
  L12 (Sign) w0.092: v2@166.002,208.645 166.002,209.067 166.481,209.547 166.481,209.577 166.669,209.765 166.7,209.765 166.782,209.848 170.733,209.848 171.385,209.196 172.129,209.196 172.404,208.921 172.404,208.177 175.981,204.6 175.981,199.998 178.473,197.506 178.473,192.85 178.649,192.673 178.698,192.673 178.698,192.307 178.44,192.049 178.44,191.529 178.662,191.306 178.662,191.182 179.86,189.984 180.425,189.984 180.894,189.515 181.171,189.515 181.515,189.171 181.515,188.894 181.724,188.685 181.724,187.57 182.414,186.88 v10(182.414,186.414)
DDR4_DQ38: U1.AA25 U9.J3 | length 29.8
  L1 w0.116: U9.J3@170.406,209.848 v2(170.809,210.252) ; U1.AA25@181.927,187.927 v10(182.414,187.44)
  L12 (Sign) w0.092: v2(170.809,210.252) 171.673,209.388 172.209,209.388 172.596,209.001 172.596,208.465 176.173,204.888 176.173,200.077 178.89,197.36 178.89,191.226 179.94,190.176 180.941,190.176 182.414,188.703 v10(182.414,187.44)
DDR4_DQ39: U1.Y23 U9.J4 | length 34.1
  L1 w0.116: v2(166.802,209.444) U9.J4@167.206,209.848 ; U1.Y23@180.927,185.927 v10(181.414,186.414)
  L12 (Sign) w0.092: v2@166.802,209.427 167.225,209.004 172.05,209.004 172.212,208.842 172.212,207.068 175.632,203.648 175.632,200.02 178.141,197.511 178.141,191.227 179.891,189.477 180.661,189.477 180.815,189.323 181.091,189.323 181.323,189.091 181.323,188.815 181.33,188.808 181.33,188.489 180.927,188.086 180.927,187.524 181.414,187.037 v10(181.414,186.414)
  L12 (Sign) w0.1: v2@166.802,209.427 v2(166.802,209.444)
DDR4_DQ40: U1.P23 U9.A3 | length 23.4
  L1 w0.116: v2(170.002,203.044) U9.A3@170.406,203.448 ; U1.P23@174.927,185.927 v10(175.414,186.414)
  L12 (Sign) w0.092: v2(170.002,203.044) 170.002,201.511 173.203,198.31 173.203,193.151 173.248,193.105 173.248,191.052 173.76,190.54 174.014,190.54 174.927,189.627 174.927,188.178 175.273,187.833 175.276,187.836 175.604,187.836 175.629,187.81 176.578,187.81 176.81,187.578 176.81,187.501 177.248,187.063 177.248,186.794 176.868,186.414 v10(175.414,186.414)
DDR4_DQ41: U1.R23 U9.B5 | length 24.3
  L1 w0.116: v2(166.002,203.844) U9.B5@166.406,204.248 ; v10(175.44,185.44) U1.R23@175.927,185.927
  L12 (Sign) w0.092: v2(166.002,203.844) 166.002,201.882 171.883,196.001 171.883,191.449 171.606,191.172 171.606,190.594 172.223,189.977 172.223,189.902 172.569,189.556 172.569,188.733 173.179,188.124 173.179,186.828 173.66,186.347 174.028,186.347 174.936,185.44 v10(175.44,185.44)
DDR4_DQ42: U1.T23 U9.C3 | length 24.2
  L1 w0.116: v2(170.002,204.644) U9.C3@170.406,205.048 ; U1.T23@176.927,185.927 v10(177.414,185.44)
  L12 (Sign) w0.092: v2(170.002,204.644) 170.002,204.064 173.724,200.342 173.724,195.821 174.248,195.297 174.248,190.775 175.552,189.471 175.552,188.849 175.606,188.795 175.606,188.783 175.667,188.722 175.678,188.722 175.756,188.644 175.756,188.633 175.81,188.578 175.81,188.484 176.276,188.018 176.642,188.018 177.002,187.658 177.002,187.58 177.44,187.142 177.44,187.014 177.902,186.553 177.902,185.927 v10(177.414,185.44)
DDR4_DQ43: U1.P26 U9.C4 | length 19.6
  L1 w0.116: U9.C4@167.206,205.048 v2(167.609,204.644) ; v10(174.44,189.414) U1.P26@174.927,188.927
  L12 (Sign) w0.092: v2(167.609,204.644) 168.631,203.623 168.631,200.279 172.606,196.304 172.606,191.794 172.799,191.601 172.799,190.601 173.986,189.414 v10(174.44,189.414)
DDR4_DQ44: U1.T25 U9.C2 | length 19.8
  L1 w0.116: v2(170.802,204.644) U9.C2@171.206,205.048 ; v10(176.44,188.414) U1.T25@176.927,187.927
  L12 (Sign) w0.092: v2(170.802,204.644) 173.916,201.531 173.916,196.49 174.44,195.967 174.44,190.926 176.44,188.927 v10(176.44,188.414)
DDR4_DQ45: U1.U23 U9.C5 | length 28.9
  L1 w0.116: v2(166.002,204.644) U9.C5@166.406,205.048 ; v10(177.44,186.414) U1.U23@177.927,185.927
  L12 (Sign) w0.092: v2(166.002,204.644) 166.002,204.293 165.875,204.165 165.869,204.165 165.681,203.977 165.681,203.972 165.481,203.772 165.481,202.095 171.691,195.885 171.691,191.618 171.399,191.326 171.399,190.455 172.377,189.477 172.377,188.608 172.987,187.998 172.987,186.169 173.749,185.407 174.407,185.407 174.89,184.925 175.95,184.925 v10(177.44,186.414)
DDR4_DQ46: U1.T26 U9.D3 | length 20.5
  L1 w0.116: v2(170.002,205.444) U9.D3@170.406,205.848 ; v10(176.44,189.414) U1.T26@176.927,188.927
  L12 (Sign) w0.092: v2(170.002,205.444) 170.012,205.435 170.315,205.435 170.483,205.267 171.177,205.267 174.288,202.156 174.288,196.861 174.927,196.222 174.927,190.927 v10(176.44,189.414)
DDR4_DQ47: U1.P24 U9.D4 | length 23.2
  L1 w0.116: U9.D4@167.206,205.848 v2(167.609,205.444) ; v10(174.44,187.414) U1.P24@174.927,186.927
  L12 (Sign) w0.092: v2(167.609,205.444) 166.84,204.675 166.84,201.587 172.328,196.099 172.328,191.456 172.607,191.176 172.607,190.521 173.563,189.566 173.563,187.587 173.735,187.414 v10(174.44,187.414)
DDR4_DQ48: U1.U26 U11.G2 | length 22.8
  L1 w0.116: v6(177.44,189.414) U1.U26@177.927,188.927 ; U11.G2@182.666,208.248 v6(183.07,207.844)
  L3 (Sign) w0.092: v6(177.44,189.414) 177.444,189.419 177.444,190.843 176.531,191.756 176.531,192.091 177.511,193.071 177.511,193.843 182.666,198.998 182.666,206.648 183.07,207.052 v6(183.07,207.844)
DDR4_DQ49: U1.V26 U11.F4 | length 26.9
  L1 w0.116: U11.F4@178.666,207.448 179.063,207.052 v6(179.063,207.049) ; U1.V26@178.927,188.927 v6(179.414,189.414)
  L3 (Sign) w0.092: v6(179.063,207.049) 180.324,207.049 182.084,205.288 182.084,198.985 177.127,194.027 177.127,193.23 176.147,192.25 176.147,191.526 177.06,190.612 177.06,189.761 176.927,189.627 176.927,189.202 177.305,188.824 177.965,188.824 178.206,189.065 179.065,189.065 v6(179.414,189.414)
DDR4_DQ50: U1.U28 U11.H3 | length 24.7
  L1 w0.116: U1.U28@177.927,190.927 v6(178.414,190.44) ; U11.H3@181.866,209.048 v6(182.27,209.452)
  L3 (Sign) w0.092: v6(178.414,190.44) 178.927,190.952 178.927,191.436 179.763,192.272 179.763,193.217 180.281,193.735 180.748,193.735 184.571,197.558 184.571,208.258 183.377,209.452 v6(182.27,209.452)
DDR4_DQ51: U1.V27 U11.H4 | length 26.4
  L1 w0.116: v6(178.44,189.44) U1.V27@178.927,189.927 ; U11.H4@178.666,209.048 v6(179.07,208.644)
  L3 (Sign) w0.092: v6(178.44,189.44) 178.32,189.32 177.965,189.32 177.738,189.093 177.307,189.093 177.119,189.281 177.119,189.547 177.252,189.681 177.252,190.692 176.339,191.605 176.339,192.171 177.319,193.15 177.319,193.948 182.276,198.905 182.276,205.438 v6(179.07,208.644)
DDR4_DQ52: U1.U30 U11.H2 | length 20.4
  L1 w0.116: U1.U30@177.927,192.927 v6(178.414,193.414) ; U11.H2@182.666,209.048 v6(183.07,208.644)
  L3 (Sign) w0.092: v6(178.414,193.414) 178.72,193.414 179.041,193.735 179.464,193.735 179.848,194.119 180.513,194.119 184.175,197.782 184.175,208.013 183.544,208.644 v6(183.07,208.644)
DDR4_DQ53: U1.V30 U11.H5 | length 26.2
  L1 w0.116: v6(177.463,209.452) U11.H5@177.866,209.048 ; U1.V30@178.927,192.927 v6(179.414,193.414)
  L3 (Sign) w0.092: v6(177.463,209.452) 177.811,209.8 180.522,209.8 181.278,209.043 183.514,209.043 184.379,208.178 184.379,197.714 180.592,193.927 179.927,193.927 v6(179.414,193.414)
DDR4_DQ54: U1.W30 U11.J3 | length 22.2
  L1 w0.116: U1.W30@179.927,192.927 v6(180.414,193.414) ; v6(181.463,209.444) U11.J3@181.866,209.848
  L3 (Sign) w0.092: v6(180.414,193.414) 180.443,193.443 180.727,193.443 184.763,197.478 184.763,208.337 183.328,209.773 181.791,209.773 v6(181.463,209.444)
DDR4_DQ55: U1.W29 U11.J4 | length 27.3
  L1 w0.116: v6(178.263,209.444) U11.J4@178.666,209.848 ; v6(179.44,192.414) U1.W29@179.927,191.927
  L3 (Sign) w0.092: v6(178.263,209.444) 178.308,209.399 180.631,209.399 181.178,208.851 182.224,208.851 182.828,208.248 183.534,208.248 183.967,207.816 183.967,197.845 180.534,194.412 179.869,194.412 179.384,193.927 178.962,193.927 178.77,193.735 178.703,193.735 178.281,193.735 178.087,193.541 178.087,193.211 178.204,193.093 178.761,193.093 v6(179.44,192.414)